# Altium PCB Power Electronics.PcbDoc
Units mm, origin at the board's own origin, x right, y up, seen from the top; angles counter-clockwise.
Board outline 88 x 88 mm, 4 copper layers (Top Layer, Int1 (GND), Int2 (PWR), Bottom Layer), stack 1.369 mm thick; 38 components, 27 nets, 116 pads, 292 vias.
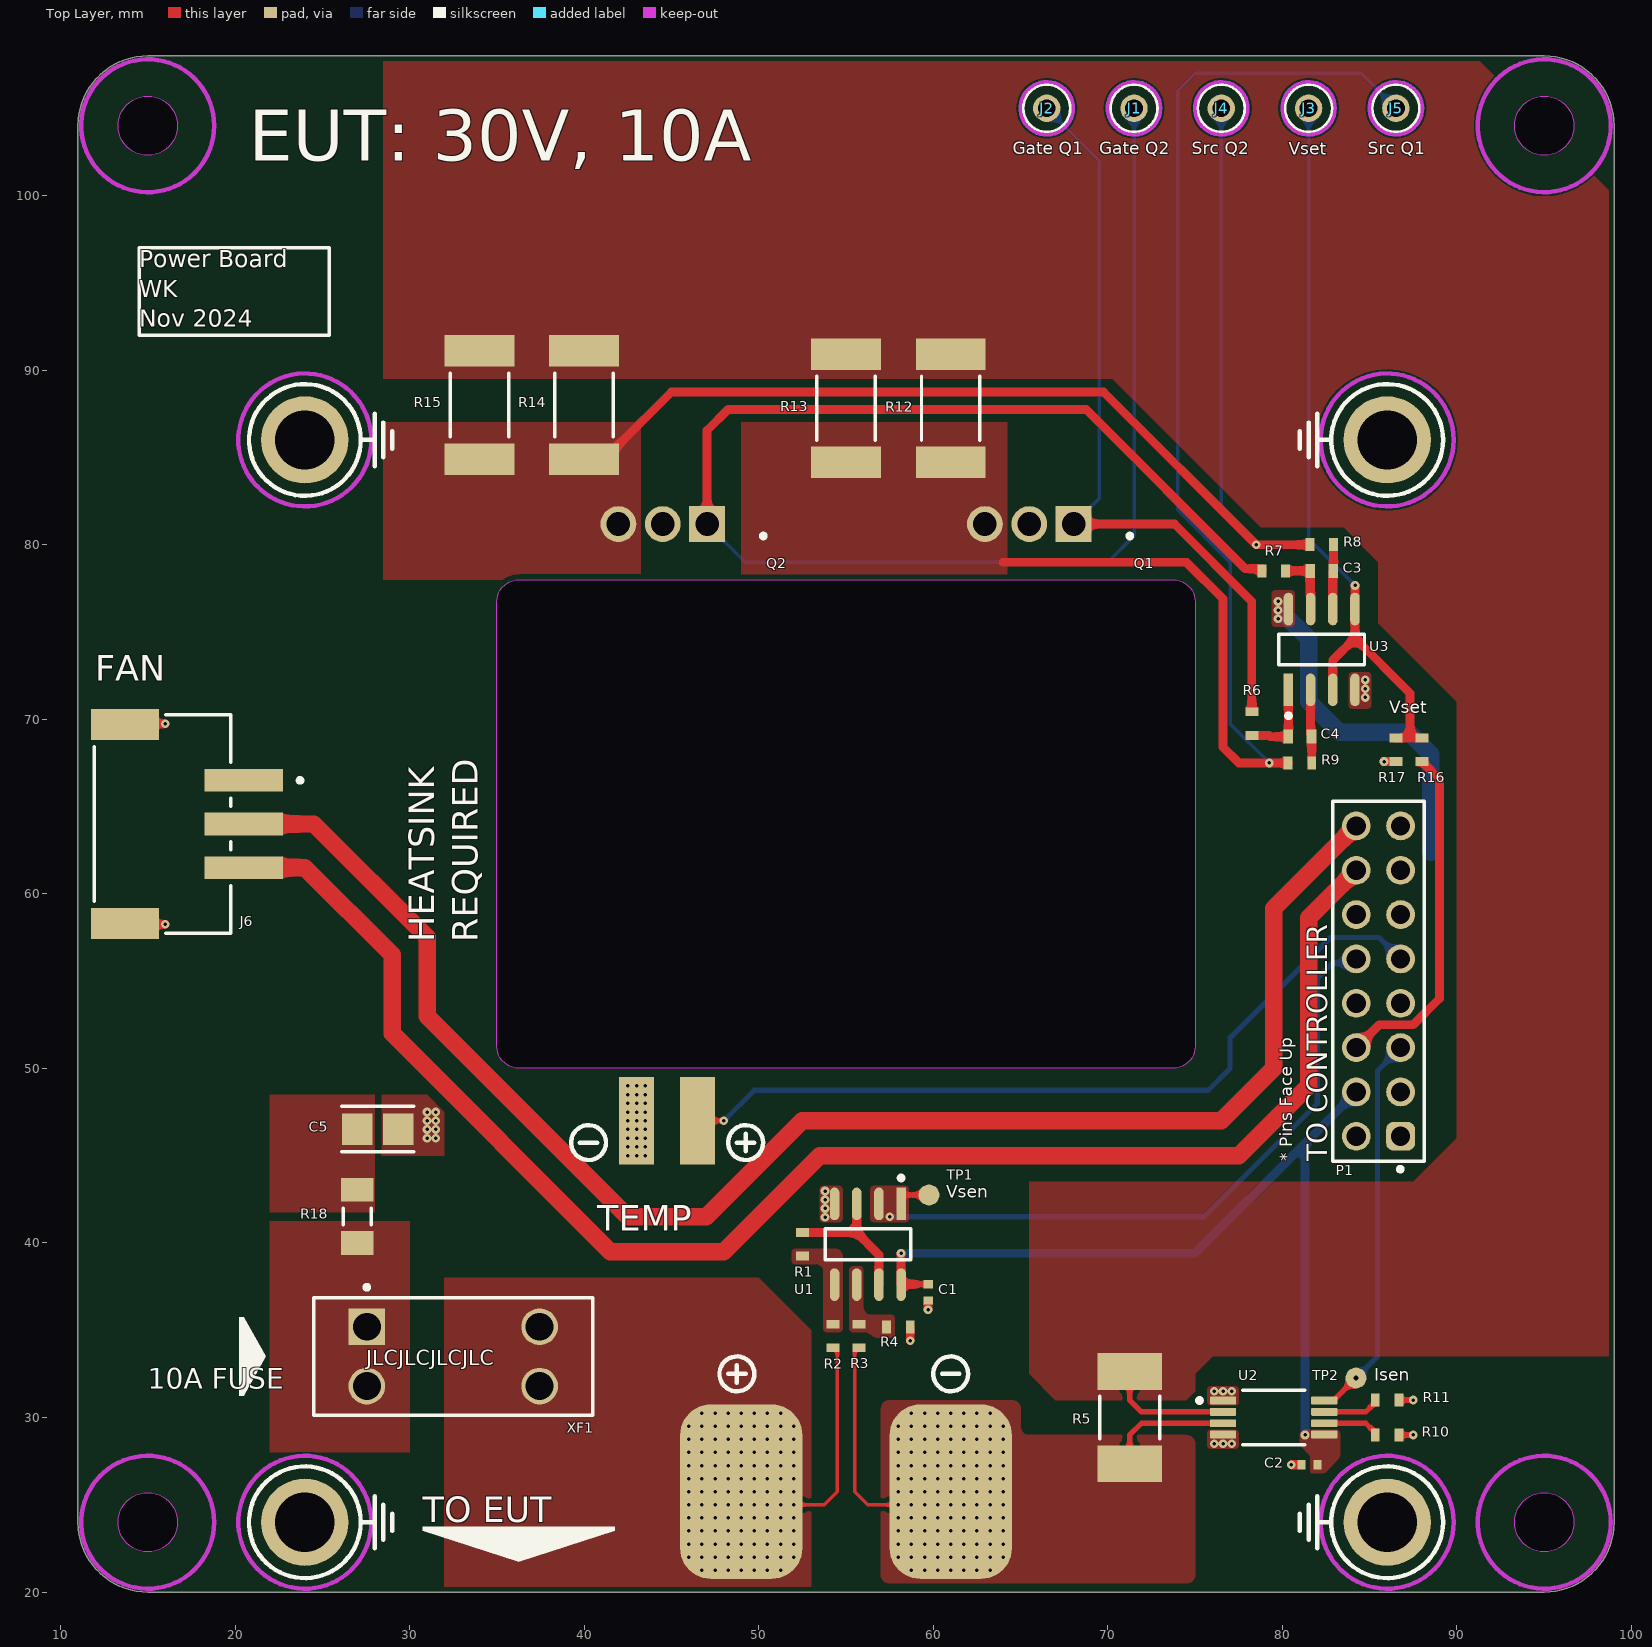
[diagram p0: Top Layer view]
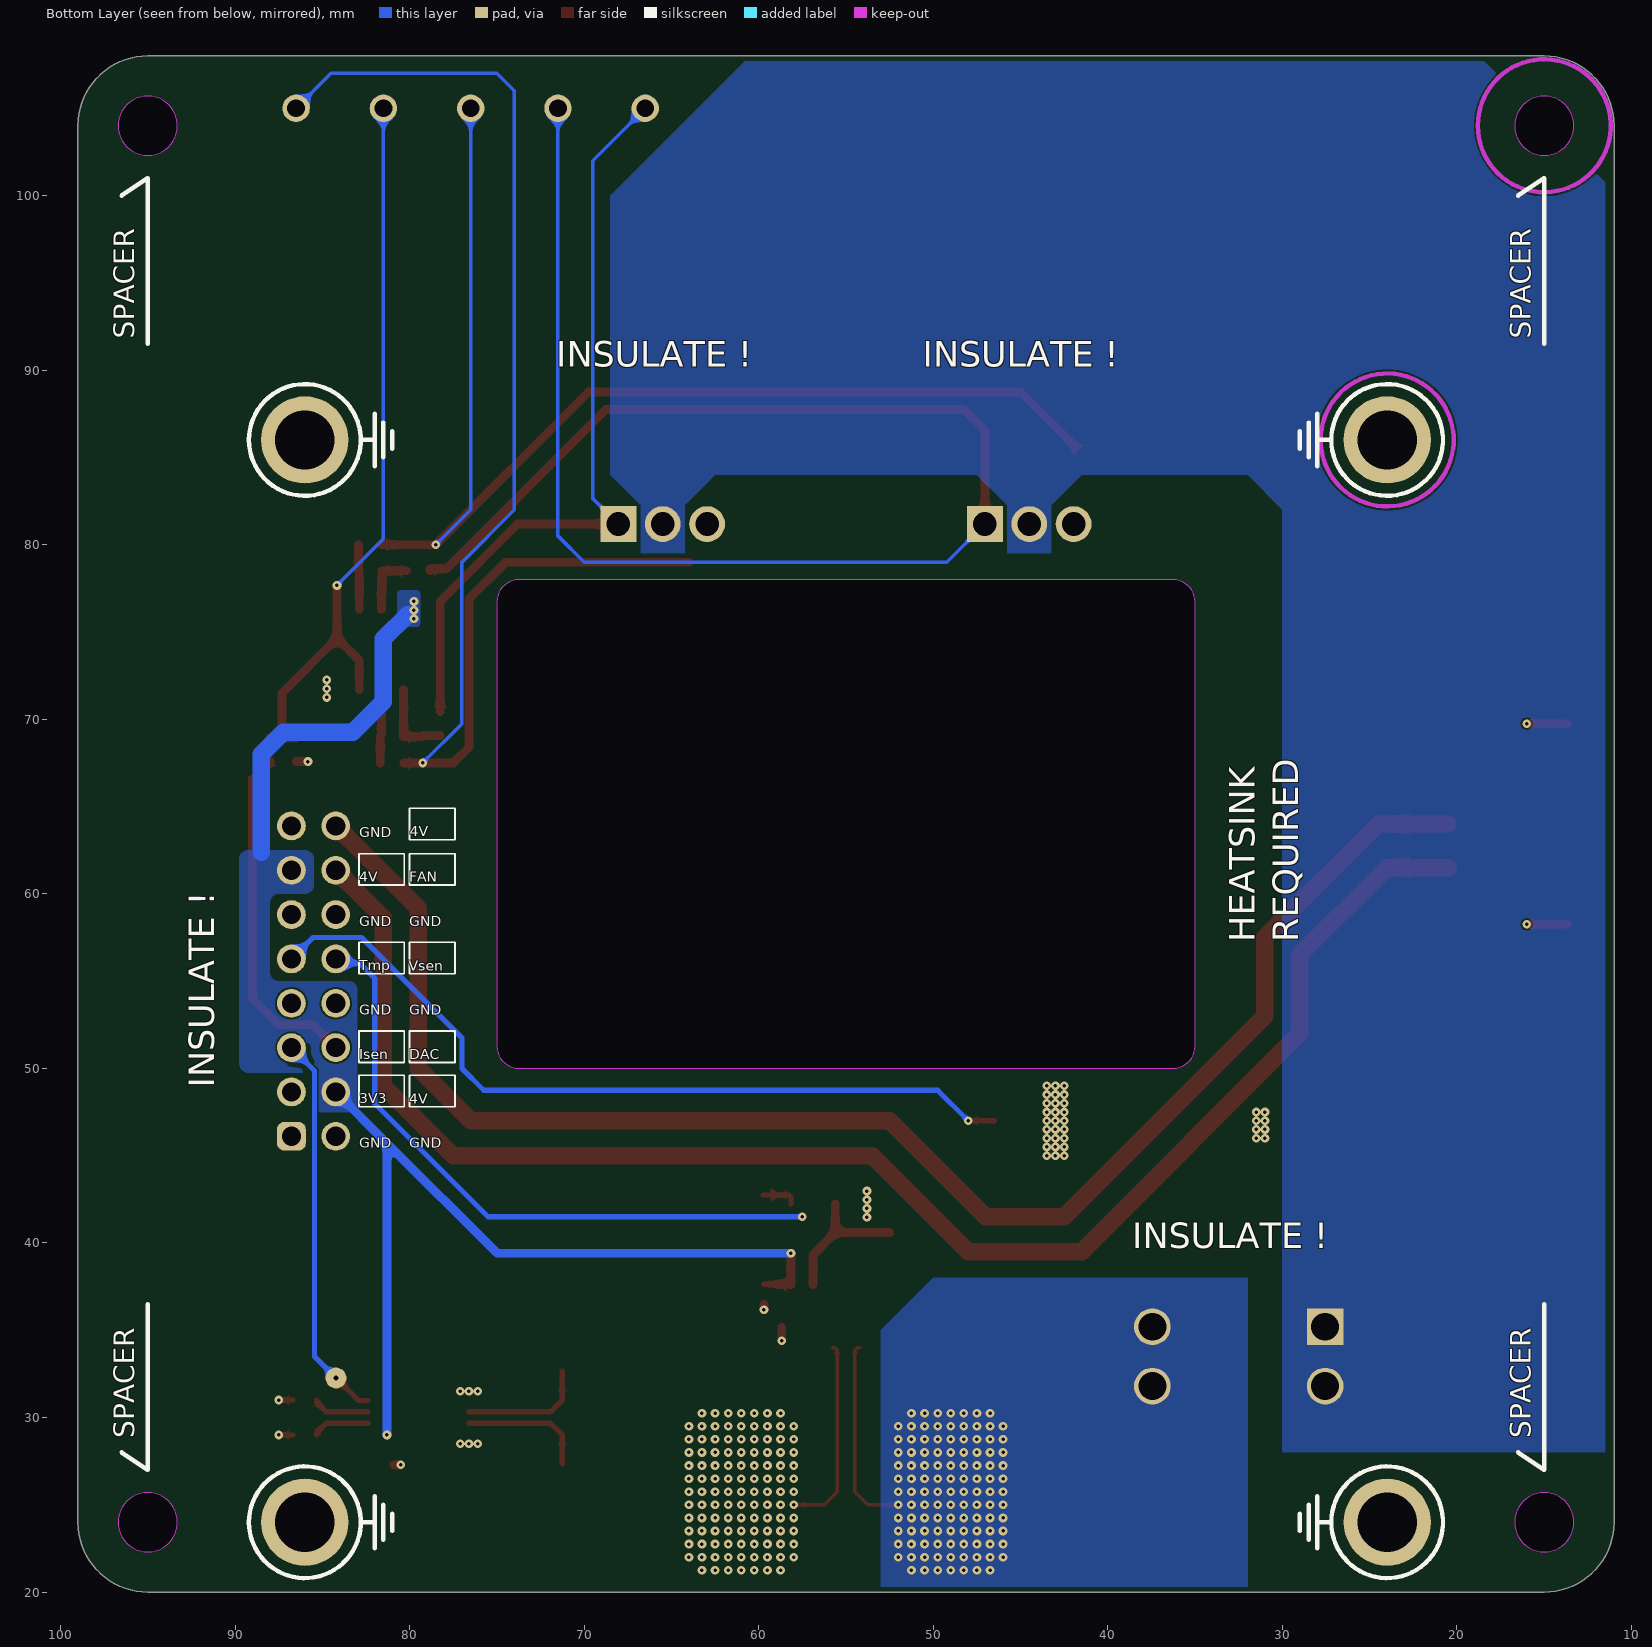
[diagram p1: Bottom Layer view, seen from below]
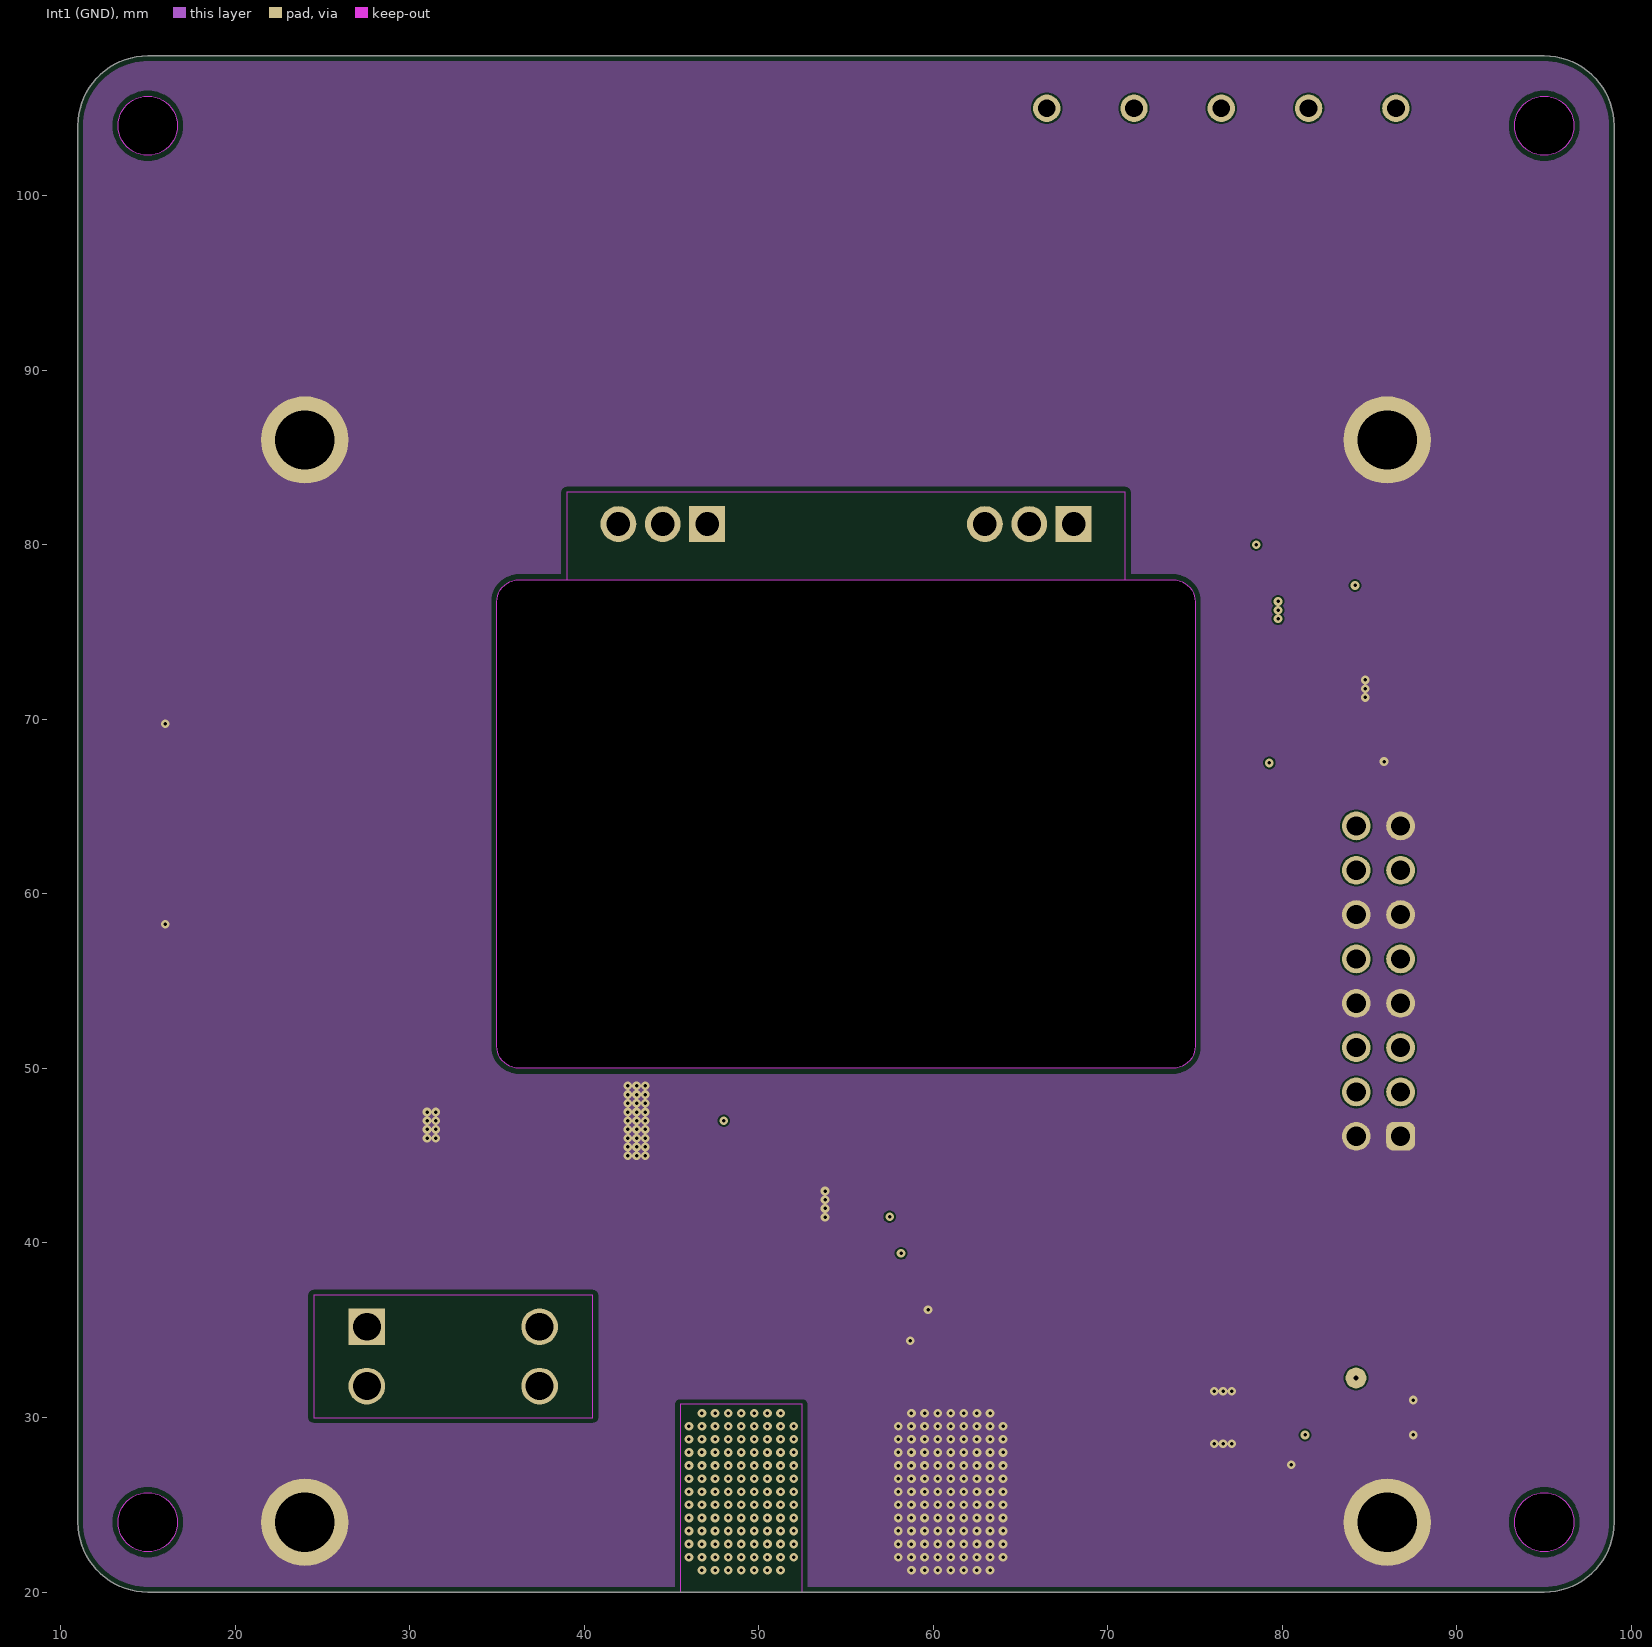
[diagram p2: Int1 (GND)]
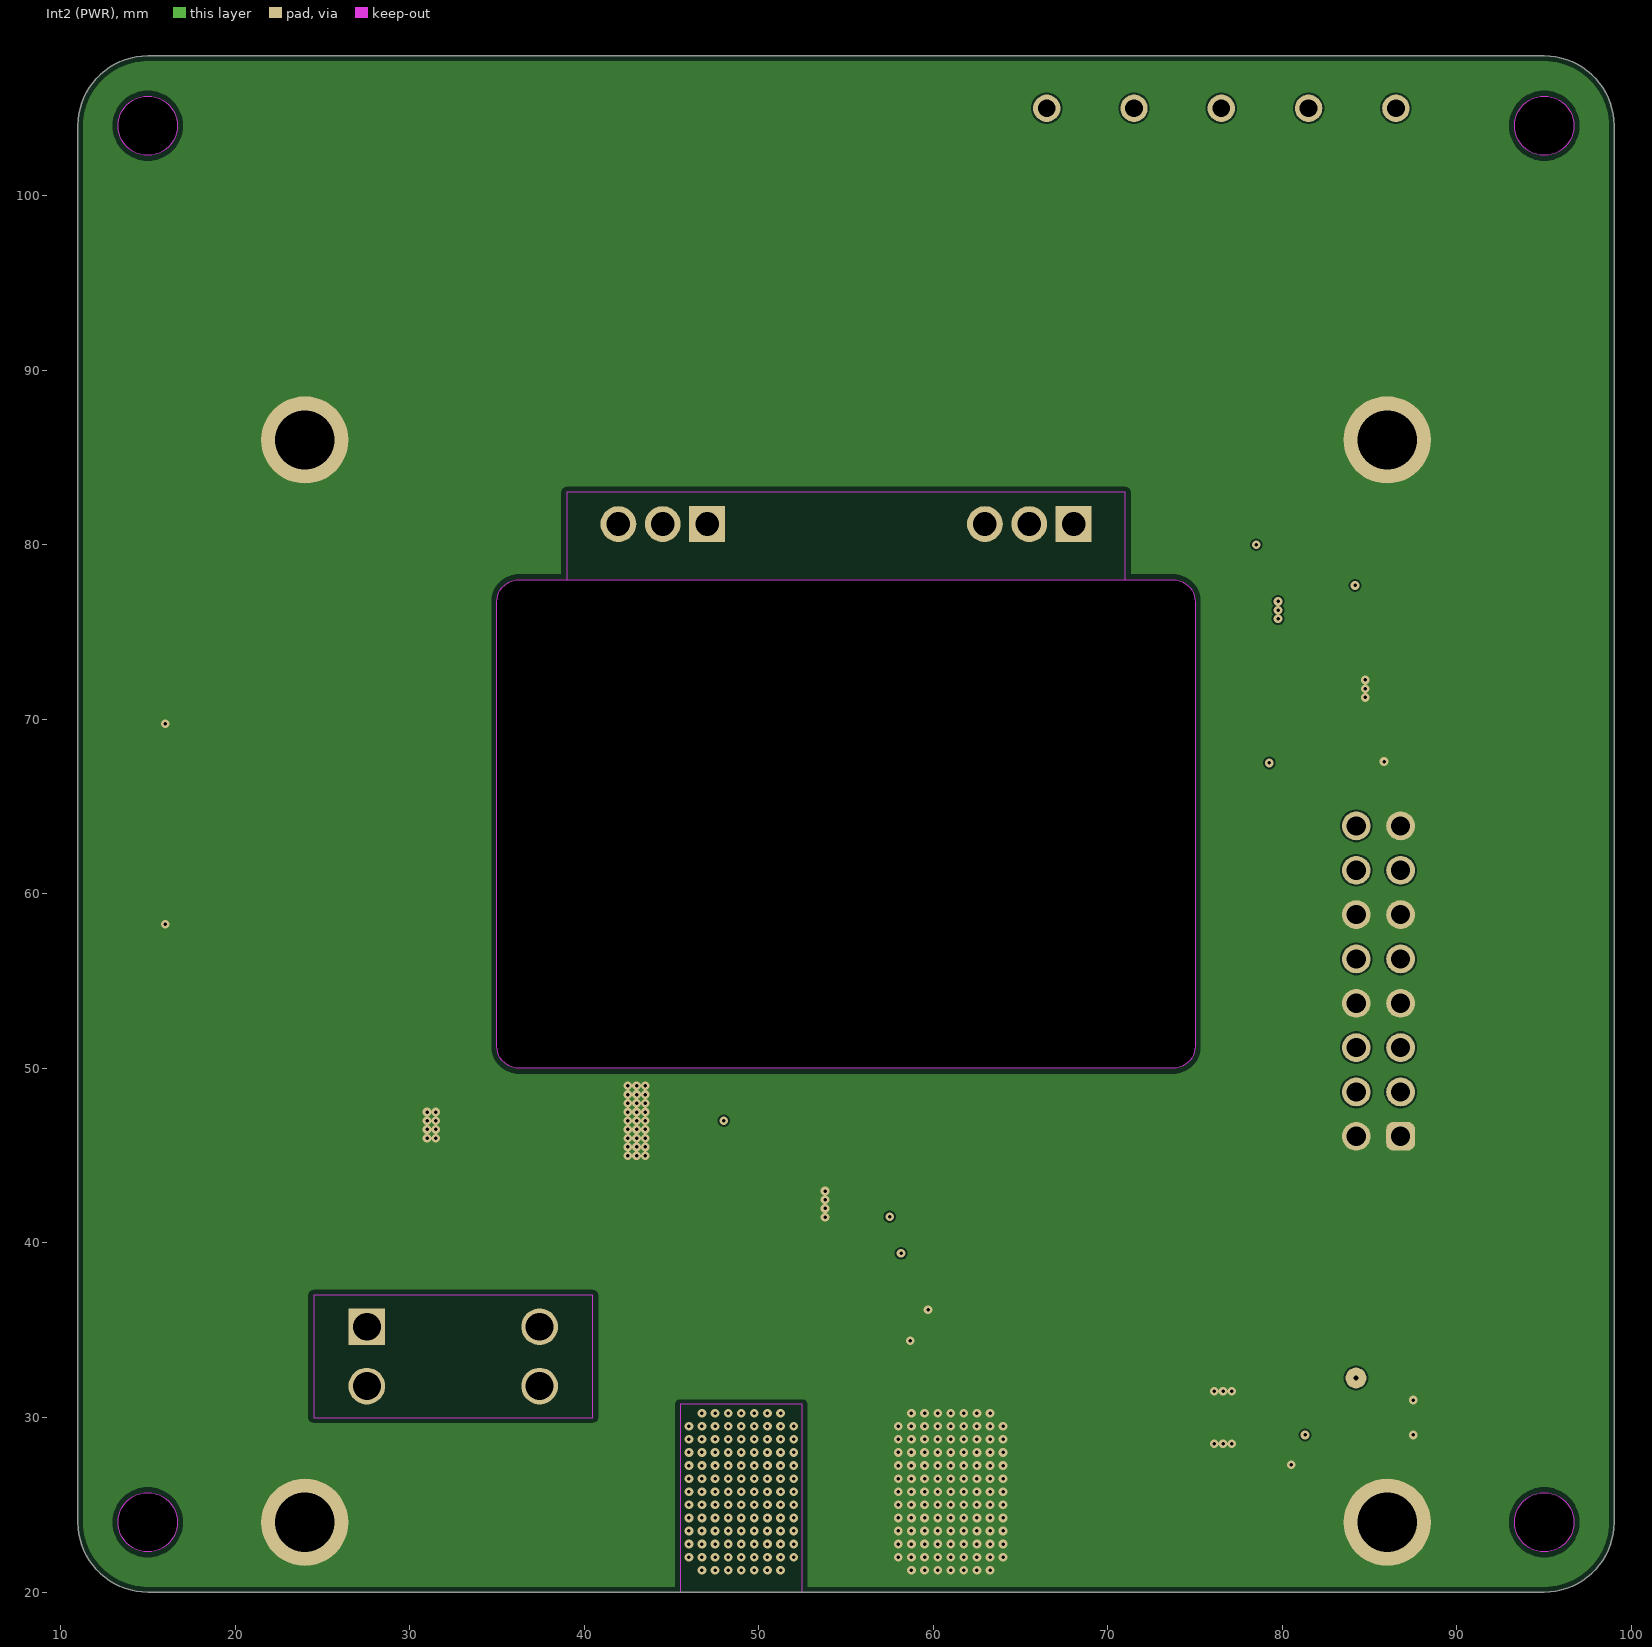
[diagram p3: Int2 (PWR)]

## Layer stack, top to bottom
Top Solder: solder mask 0.0254, SM-001, Dk 4
Top Layer: signal copper 0.035
Dielectric 1: prepreg 0.1295, PP-017, Dk 4.3
Dielectric 2: prepreg 0.1295, PP-017, Dk 4.3
Int1 (GND): signal copper 0.035
Dielectric 3: core 0.7112, Core-039, Dk 4.8
Int2 (PWR): signal copper 0.035
Dielectric 4: prepreg 0.1295, PP-017, Dk 4.3
Dielectric 5: prepreg 0.1295, PP-017, Dk 4.3
Bottom Layer: signal copper 0.035
Bottom Solder: solder mask 0.0254, SM-001, Dk 4

## Board outline
15,20 95,20 ccw(c95,24) 99,24 99,104 ccw(c95,104) 95,108 15,108 ccw(c15,104) 11,104 11,24 ccw(c15,24)
cut-out: 36.27,50 cw(c36.27,51.27) 35,51.27 35,76.73 cw(c36.27,76.73) 36.27,78 73.73,78 cw(c73.73,76.73) 75,76.73 75,51.27 cw(c73.73,51.27) 73.73,50
cut-out: 15,102.3 cw(c15,104) 13.3,104 cw(c15,104) 15,105.7 cw(c15,104) 16.7,104 cw(c15,104)
cut-out: 95,102.3 cw(c95,104) 93.3,104 cw(c95,104) 95,105.7 cw(c95,104) 96.7,104 cw(c95,104)
cut-out: 95,22.3 cw(c95,24) 93.3,24 cw(c95,24) 95,25.7 cw(c95,24) 96.7,24 cw(c95,24)
cut-out: 15,22.3 cw(c15,24) 13.3,24 cw(c15,24) 15,25.7 cw(c15,24) 16.7,24 cw(c15,24)

## Design rules (kind name [scope] priority, off if disabled: settings)
BoardOutlineClearance [All] p1: gap=0.3 ignorepadtopadclearanceinfootprint=FALSE
Clearance [All] p1: gap=0.1 ignorepadtopadclearanceinfootprint=FALSE except(0.3: Fill-Fill Fill-Poly Fill-Region Poly-Poly Poly-Region Region-Region)
DiffPairsRouting [All] p1: maxlimit=0.3 minlimit=0.1 mostfreqgap=0.2 toplayer_minwidth=0.1 toplayer_maxwidth=0.381 toplayer_prefwidth=0.3 midlayer1_minwidth=0.1 midlayer1_maxwidth=0.381 midlayer1_prefwidth=0.3 midlayer2_minwidth=0.1 midlayer2_maxwidth=0.381 midlayer2_prefwidth=0.3 bottomlayer_minwidth=0.1 bottomlayer_maxwidth=0.381 bottomlayer_prefwidth=0.3 maxuncoupledlength=12.7
HoleSize [All] p1: absolutevalues=TRUE maxlimit=5 minlimit=0.025 maxpercent=80.000 minpercent=20.000
MinimumSolderMaskSliver [All] p1: minsoldermaskwidth=0.025
PlaneClearance [All] p1: clearance=0.1
PlaneConnect [All] p1: planeconnectstyle=Direct reliefexpansion=0.508 reliefentries=4 reliefconductorwidth=0.254 reliefairgap=0.254
PolygonConnect [All] p1: connectstyle=Direct reliefconductorwidth=0.254 reliefentries=4 polygonreliefangle="90 Angle" airgapwidth=0.254
RoutingVias [All] p1: holewidth=0.711 width=1.27 viastyle="Through Hole" minholewidth=0.711 minwidth=1.27 maxholewidth=0.711 maxwidth=1.27
SilkToSilkClearance [All] p1: silktosilkclearance=0
SilkToSolderMaskClearance [IsPad] p1: minsilkscreentomaskgap=0.1 clearancetoexposedcopper=TRUE
SolderMaskExpansion [All] p1: expansion=0.102 istentingtop=FALSE
SupplyNets "Schematic Supply Nets_3" [InNet('+4.096V')] p1: voltage=0.000
SupplyNets "Schematic Supply Nets_2" [InNet('GND')] p2: voltage=0.000
SupplyNets "Schematic Supply Nets_1" [InNet('+12V')] p3: voltage=0.000
SupplyNets "Schematic Supply Nets" [InNet('+3V3')] p4: voltage=0.000
Width [All] p1: maxlimit=5 minlimit=0.1 preferedwidth=0.2
23 further rules are at their usual default settings.

## Classes and differential pairs
component class Top: J6
component class U_MOSFETs: C3 C4 C5 J1 J2 J3 J4 J5 Q1 Q2 R6 R7 R8 R9 R12 R13 R14 R15 R16 R17 R18 U3
component class "U_Power Monitor": C1 C2 R1 R2 R3 R4 R5 R10 R11 TP1 TP2 U1 U2
component class U_IO: P1 XF1

## Components (designator, comment, footprint, x,y, rotation, side; value= is the part's Value field where it differs from the comment)
C1 "100nF" "IPC C C0402 NO SILK" 59.7,37.175 r90 top
C2 "100nF" "IPC C C0402 NO SILK" 81.54,27.29 r0 top
C3 "220pF" "IPC C C0603 NO SILK" 82.25,78.5 r180 top
C4 "220pF" "IPC C C0603 NO SILK" 81,69 r180 top
C5 "C3216X7S2A225K160AB" FP-C3216-160-0_2-IPC_B 28.176,46.526 r0 top
J1 "5001" FP-5001-MFG 71.5,105 r90 top
J2 "5001" FP-5001-MFG 66.5,105 r90 top
J3 "5001" FP-5001-MFG 81.5,105 r90 top
J4 "5001" FP-5001-MFG 76.5,105 r90 top
J5 "5001" FP-5001-MFG 86.5,105 r90 top
J6 "S3B-XH-SM4-TB(LF)(SN)" FP-S3B-XH-SM4-TB_LF_SN-MFG 15.85,64 r270 top
P1 "61301621121" 61301621121 85.5,55 r90 top
Q1 "IRF530PBF" FP-X15-0364-MFG 65.5,80.5 r270 top
Q2 "IRF530PBF" FP-X15-0364-MFG 44.5,80.5 r270 top
R1 "2K" "IPC C R0603 NO SILK" 52.5,39.925 r90 top
R2 "20K" "IPC C R0603 NO SILK" 54.25,34.675 r90 top
R3 "20K" "IPC C R0603 NO SILK" 55.75,34.675 r90 top
R4 "2K" "IPC C R0603 NO SILK" 58,35.175 r0 top
R5 "WSLP25125L000FEA" FP-WSLP2512-0R005-0R0069-MFG 71.25,30 r90 top
R6 "100R" "IPC C R0603 NO SILK" 78.25,69.75 r90 top
R7 "100R" "IPC C R0603 NO SILK" 79.5,78.5 r180 top
R8 "3K3" "IPC C R0603 NO SILK" 82.25,80 r180 top
R9 "3K3" "IPC C R0603 NO SILK" 81,67.5 r180 top
R10 "0R" "IPC C R0603 NO SILK" 86,29 r180 top
R11 "0R" "IPC C R0603 NO SILK" 86,31 r180 top
R12 "200mΩ" FP-RL2512-MFG 61,87.815 r270 top
R13 "200mΩ" FP-RL2512-MFG 55,87.815 r270 top
R14 "200mΩ" FP-RL2512-MFG 40,88 r270 top
R15 "200mΩ" FP-RL2512-MFG 34,88 r270 top
R16 "68K" "IPC C R0603 NO SILK" 88,68.25 r270 top
R17 "12K" "IPC C R0603 NO SILK" 86.5,68.25 r90 top
R18 "CRCW12062R20FKEA" FP-CRCW1206-e3-IPC_A 27,41.526 r270 top
TP1 "TP1" TP1#1 59.75,42.75 r90 top
TP2 "TP1" TP1#2 84.213,32.263 r90 top
U1 "LMV358AIDR" FP-D0008A-IPC_C 56.25,39.925 r270 top
U2 "INA240A2PWR" FP-PW0008A-MFG 79.5,30 r0 top
U3 "LMV358AIDR" FP-D0008A-IPC_C 82.25,74 r90 top
XF1 "3568" KSTN-3568_V 32.5,33.5 r0 top

## Footprints (in the part's own frame and the unit in brackets; to place one, negate y for a bottom-side part, rotate by r counter-clockwise, add the part's x,y. Pads: shape width x height; smd on the part's side, far side on the other; paste and mask are expansions set on the pad)
61301621121 [mm] "Pin Header, pitch 2.54 mm, THT, Vertical, dual row, 16p"
  rrect50% 1.65x1.65 hole 1.1: 1(-8.89,-1.27)
  round 1.65 hole 1.1: 2(-8.89,1.27) 3(-6.35,-1.27) 4(-6.35,1.27) 5(-3.81,-1.27) 6(-3.81,1.27) 7(-1.27,-1.27) 8(-1.27,1.27) 9(1.27,-1.27) 10(1.27,1.27) 11(3.81,-1.27) 12(3.81,1.27) 13(6.35,-1.27) 14(6.35,1.27) 15(8.89,-1.27) 16(8.89,1.27)
  silkscreen extent -10.89,-2.62 10.31,2.62, body extent -10.16,-2.54 10.16,2.54, height 8.59
FP-5001-MFG [mm]
  round 1.57 hole 1.016 paste-2539.97 mask+0: 1(0,0)
  silkscreen extent -1.34,-1.35 1.34,1.35, body extent -1.45,-1.45 1.45,1.45, height 0.25
FP-C3216-160-0_2-IPC_B [mm]
  rect 1.754x1.806 smd paste+0 mask+0: 1(-1.176,0) 2(1.176,0)
  silkscreen extent -2.05,-1.3 2.05,1.3, body extent -2.3,-1.15 2.3,1.15, height 0.25
FP-CRCW1206-e3-IPC_A [mm]
  rect 1.356x1.858 smd paste+0 mask+0: 1(-1.526,0) 2(1.526,0)
  silkscreen extent -0.47,-0.8 0.47,0.8, body extent -2.7,-1.43 2.7,1.43, height 0.25
FP-D0008A-IPC_C [mm]
  rect 1.869x0.542 smd paste+0 mask+0: 1(-2.314,1.905)
  rrect100% 1.869x0.542 smd paste+0 mask+0: 2(-2.314,0.635) 3(-2.314,-0.635) 4(-2.314,-1.905) 5(2.314,-1.905) 6(2.314,-0.635) 7(2.314,0.635) 8(2.314,1.905)
  silkscreen extent -3.92,-2.45 0.88,2.45, body extent -3.35,-2.55 3.35,2.55, height 0.25
FP-PW0008A-MFG [mm]
  rrect22% 1.5x0.45 smd paste+0 mask+0: 1(-2.9,0.975) 2(-2.9,0.325) 3(-2.9,-0.325) 4(-2.9,-0.975) 5(2.9,-0.975) 6(2.9,-0.325) 7(2.9,0.325) 8(2.9,0.975)
  silkscreen extent -4.37,-1.55 1.78,1.55, body extent -3.75,-1.8 3.75,1.8, height 0.25
FP-RL2512-MFG [mm]
  rect 1.8x4 smd paste+0 mask+0: 1(-3.1,0) 2(3.1,0)
  silkscreen extent -1.83,-1.68 1.83,1.68, body extent -4.1,-2.1 4.1,2.1, height 0.25
FP-S3B-XH-SM4-TB_LF_SN-MFG [mm]
  rect 1.3x4.5 smd paste+0 mask+0: 1(-2.5,4.65) 2(0,4.65) 3(2.5,4.65)
  rect 1.8x3.9 smd paste+0 mask+0: 4(-5.7,-2.15) 5(5.7,-2.15)
  silkscreen extent -6.25,-3.9 6.25,8, body extent -6.7,-4.2 6.7,7, height 0.25
FP-WSLP2512-0R005-0R0069-MFG [mm]
  rect 2.11x3.68 smd paste+0 mask+0: 1(-2.645,0) 2(2.645,0)
  silkscreen extent -1.21,-1.72 1.21,1.72, body extent -3.8,-1.94 3.8,1.94, height 0.25
FP-X15-0364-MFG [mm]
  rect 2.05x2.05 hole 1.35 paste-2539.97 mask+0: 1(-0.685,2.54)
  round 2.05 hole 1.35 paste-2539.97 mask+0: 2(-0.685,0) 3(-0.685,-2.54)
  silkscreen extent -0.12,5.64 0.12,5.89, body extent -2.42,-5.36 2.42,5.36, height 0.25
"IPC C C0402 NO SILK" [mm] "Chip Capacitor, 2-Leads, Body 1.02x0.51mm, IPC High Density"
  rect 0.46x0.54 smd: 1(-0.46,0) 2(0.46,0)
  body extent -0.51,-0.26 0.51,0.25, height 0.51
"IPC C C0603 NO SILK" [mm] "Chip Capacitor, 2-Leads, Body 1.52x0.76mm, IPC High Density"
  rect 0.56x0.8 smd: 1(-0.66,0) 2(0.66,0)
  body extent -0.76,-0.38 0.76,0.38, height 0.77
"IPC C R0603 NO SILK" [mm] "Chip Resistor, 2-Leads, Body 1.52x0.76mm, IPC High Density"
  rect 0.5x0.75 smd: 1(-0.675,0) 2(0.675,0)
  body extent -0.76,-0.38 0.76,0.38, height 0.39
KSTN-3568_V [mm] "THD, 4-Leads, Body 16x6.73mm, Pitch 9.9mm"
  rect 2.1x2.1 hole 1.6: 1(-4.95,1.7)
  round 2.1 hole 1.6: 2(-4.95,-1.7) 3(4.95,1.7) 4(4.95,-1.7)
  silkscreen extent -8,-3.36 8,4.09, body extent -8,-3.37 8,3.37, height 7.44
TP1#1 [mm]
  round 1.2 smd: 1(0,0)
TP1#2 [mm]
  round 1.2 hole 0.3: 1(0,0)

## Part data
C1 C2: library part CMP-002-000000-1, Design Item ID="Generic CAP 0402", Source=Schlib1.SchLib
C3 C4: library part CMP-002-000001-1, "Generic CAP 0603", Design Item ID="Generic CAP 0603", Source=Schlib1.SchLib
C5: library part CMP-08246-004303-1, "Multilayer Ceramic Capacitors 2.2uF ±10% 100V X7S SMD 1206", Capacitance=2.2uF, Case Code (Imperial)=1206, Case Code (Metric)=3216, Dielectric=X7S, Max Operating Temperature=125°C, Min Operating Temperature=-55°C, Package Quantity=1, Resistor Type=Ceramic, Tolerance=10%, Voltage=100V, Case/Package=1206, Construction=Flat, Depth=1.6mm, Height=1.6mm, Lead Free="Lead Free", Length=3.2mm, Mount="Surface Mount", Number of Pins=2, Packaging="Tape and Reel", Radiation Hardening=No, REACH SVHC="No SVHC", RoHS Compliant=Yes, Series=C, Termination=SMD/SMT, Thickness=0.071inch, Voltage Rating=100V, Voltage Rating (DC)=100V, Weight=0.000571oz, Width=0.063inch
J1 J2 J3 J4 J5: library part CMP-2000-05181-2, "PC TEST POINT MINIATURE BLACK", Color=Black, Flammability Rating="UL94 V-0", Package Quantity=100, Body Material=Bronze, Contact Material=Bronze, Contact Plating=Silver, Diameter=2.54mm, Height=0.3inch, Hole Diameter=1.6mm, Housing Color=Black, Inside Diameter=1.27mm, Insulation=Insulated, Insulation Material=Nylon, Lead Free="Lead Free", Length=7.62mm, Material=Nylon, Mount="Through Hole", Number of Contacts=1, Number of Ports=1, Orientation=Straight, Outside Diameter=2.54mm, Packaging=Bulk, Plating=Silver, REACH SVHC="No SVHC", RoHS Compliant=Yes, Series=THM, Termination="Through Hole"
J6: library part CMP-17439-000066-1, "CONN HEADER SMD R/A 3POS 2.5MM", Color=Natural, Contact Resistance=20mR, Housing Color=Beige, Max Current Rating=3A, Max Operating Temperature=85°C, Max Voltage Rating (AC)=250V, Min Operating Temperature=-25°C, Package Quantity=1, Connector Type="Male Pin", Contact Material="Copper Alloy", Contact Plating=Tin, Contact Type="Male Pin", Depth=10mm, Fastening Type=Detent, Gender=Male, Housing Material=Polyamide, Lead Free="Lead Free", Length=12.5mm, Mount="Surface Mount", Number of Contacts=3, Number of Positions=3, Number of Rows=1, Orientation="Right Angle", Packaging="Tape and Reel", Pitch=2.5mm, REACH SVHC="No SVHC", Series=XH, Termination=Solder
P1: library part CMP-1502-01097-3, Color=Black, Contact Resistance=20mΩ, Current Rating=3A, Max Operating Temperature=105°C, Min Operating Temperature=-40°C, Operating Supply Voltage=250V, Connector Type="Male Pin", Contact Material=Copper, Contact Mating Length=5.9944mm, Contact Plating=Gold, Gender=Male, Height=8.89mm, Lead Pitch=2.54mm, Mount="Through Hole", NexarPartId=32855550, Number of Contacts=16, Number of Pins=16, Number of Positions=16, Number of Rows=2, Orientation=Vertical, Packaging=Bulk, Pitch=2.54mm, REACH SVHC=Unknown, RoHS=Compliant, Row Spacing=2.54mm, Termination=Solder, Voltage Rating=250V
Q1 Q2: library part CMP-02550-000190-1, "MOSFET N-CH 100V 14A TO-220AB", Continuous Drain Current=14A, Drain To Source Breakdown Voltage=100V, Drain To Source Resistance=0.16Ω, Gate To Source Voltage=20V, Input Capacitace At Vds="670pF @ 25V", Manufacturer=Vishay, Max Forward Diode Voltage=2.5V, Max Junction Temp=+175°C, Package=X15-0364, Power Dissipation=88W, Pulse Drain Current=56A, Temperature="-55°C to +175°C", Temperature Range Low=-55°C, Automotive=No, Category=Trans, ComponentLink2Description=Datasheet, ComponentLink2URL=http://www.vishay.com/docs/91019/91019.pdf, Depletion Mode=False, Device Class L1="Discrete Semiconductors", Device Class L2=Transistors, Device Class L3=MOSFETs, Digikey Description="MOSFET N-CH 100V 14A TO-220AB", Drain To Source Voltage=100V, Gate Charge At Vgs="26nC @ 10V", Height=19.89mm, Lead Free=Yes, Manufacturer Part Number=IRF530PBF, Mouser Description="MOSFET N-Chan 100V 14 Amp", Number of Channels=1, Number Of N Channels=1, Octopart=https://octopart.com/irf530pbf-vishay-46547999, Reverse Recovery Charge=850nC, Reverse Recovery Time=150ns, RoHS=TRUE, Rthja Max=62°C/W, Standoff Height=3.33mm, Temperature Range High=+175°C, Threshold Vgs Max=4V, Threshold Vgs Min=2V, Turn Off Delay Time=23ns, Turn On Delay Time=10ns
R1 R4 R6 R7 R8 R9 R10 R11 R16 R17: library part CMP-008-000001-2, "Generic RES 0603", Design Item ID="Generic RES 0603", Source=Schlib1.SchLib
R2 R3: library part CMP-008-000001-2, "Generic RES 0603 / C136942", Design Item ID="Generic RES 0603", Source=Schlib1.SchLib
R5: library part CMP-00030-22061781-1, "WSLP25125L000FEA Res Metal Strip 2512 0.005 Ohm 1% 3W ±110ppm/C Sulfur Resistant Pad SMD Automotive T/R", Case Code (Imperial)=2512, Case Code (Metric)=6432, Max Operating Temperature=170°C, Min Operating Temperature=-65°C, Power Rating=3W, Resistance=5mΩ, Temperature Coefficient=110ppm/°C, Tolerance=1%, Case/Package=2512, Composition="Metal Element, Metal Strip", Height=635µm, Lead Free="Lead Free", Length=6.4mm, Mount="Surface Mount", NexarPartId=22061781, Packaging="Cut Tape", REACH SVHC=Unknown, RoHS=Compliant, Schedule B="8533210045, 8533210045", Termination=SMD/SMT, Width=3.2mm
R12 R13 R14 R15: library part CMP-03412-002864-1, "RES 0.2 OHM 1% 1W 2512 / RL2512FK-070R2L", Manufacturer=Yageo, Manufacturer Part Number=RL2512FK-070R2L, Package=RL2512, Power Rating=1W, Temperature="-55°C to +155°C", Temperature Coefficient=600ppm/°C, Temperature Range High=+155°C, Temperature Range Low=-55°C, Tolerance=1%, Automotive=Yes, Automotive Grade="Grade 0", Category=Res, ComponentLink2Description=Datasheet, ComponentLink2URL=http://www.yageo.com/documents/recent/PYu-RL_Group_521_RoHS_L_2.pdf, Composition="Thick Film", Device Class L1="Passive Components", Device Class L2=Resistors, Device Class L3="Chip SMD Resistors", Digikey Description="RES 0.2 OHM 1% 1W 2512", Footprint Url=http://www.yageo.com/exep/pages/download/literatures/PYu-R_Mount_10.pdf, Height=0.65mm, Ipc Land Pattern Name=RESC635320X55, Lead Free=Yes, Mouser Description="Res Thick Film 2512 0.2 Ohm 1% 1W ±600ppm/C Epoxy Pad SMD Automotive T/R", Octopart=https://octopart.com/rl2512fk-070r2l-yageo-22252310, Resistance=200mΩ, RoHS=TRUE, Series=RL
R18: library part CMP-2003-02449-2, "RES Thick Film, 2.2Ω, 1%, 0.25W, 100ppm/°C, 1206", Case Code (Imperial)=1206, Case Code (Metric)=3216, Max Operating Temperature=155°C, Max Power Dissipation=250mW, Min Operating Temperature=-55°C, Package Quantity=10, Resistance=2.2R, Temperature Coefficient=100ppm/°C, Tolerance=1%, Voltage Rating=200V, Case/Package=1206, Composition="Thick Film", Contact Plating=Tin, Depth=1.6mm, Features="Automotive AEC-Q200", Height=0.55mm, Lead Free="Lead Free", Length=3.2mm, Military Standard=Not, Number of Pins=2, Number of Terminations=2, Packaging="Tape and Reel", Power Rating=250mW, Radiation Hardening=No, Termination=SMD/SMT, Voltage Rating (DC)=200V, Weight=0.000353oz, Width=0.063inch
TP1 TP2: library part CMP-00003-3, "Testpoint double sided"
U1: library part CMP-04895-000233-1, "IC OPAMP GP 2 CIRCUIT 8SOIC / C182039", Case/Package=SOIC, Input Bias Current=10pA, Input Offset Voltage (Vos)=1mV, Max Operating Temperature=125°C, Min Operating Temperature=-40°C, Operating Supply Current=80uA, Gain Bandwidth Product=1MHz, Mount="Surface Mount", Number of Channels=2, Number of Circuits=2, Number of Pins=8, Packaging="Cut Tape", RoHS Compliant=Yes, Slew Rate=1.7V/µs
U2: library part CMP-04895-000047-1, "IC AMP CURRENT SENSE 8-TSSOP", Ambient Temperature Range High=+125°C, Ambient Temperature Range Low=-40°C, Input Bias Current=90uA, Input Offset Voltage=0.005mV, Manufacturer="Texas Instruments", Max Junction Temp=+150°C, Max Supply Voltage=5.5V, Min Supply Voltage=2.7V, Nominal Supply Current=1.8mA, Package=PW0008A, Temperature="-40°C to +125°C", Voltage Gain=0.05V/mV, Automotive=No, Bandwidth=400kHz, Category=IC, ComponentLink2Description=Datasheet, ComponentLink2URL=http://www.ti.com/lit/ds/symlink/ina240.pdf, Device Class L1="Integrated Circuits (ICs)", Device Class L2="Linear ICs", Device Class L3=Instrumentation, Digikey Description="IC AMP CURRENT SENSE 8-TSSOP", Height=1.2mm, Ipc Land Pattern Name=SOP65P300X120-8, Lead Free=Yes, Manufacturer Part Number=INA240A2PWR, Number of Channels=1, Octopart=https://octopart.com/ina240a2pwr-texas+instruments-75431049, RoHS=TRUE, Standoff Height=0.05mm, Temperature Range High=+125°C, Temperature Range Low=-40°C
U3: library part CMP-04895-000233-1, "IC OPAMP GP 2 CIRCUIT 8SOIC", Case/Package=SOIC, Input Bias Current=10pA, Input Offset Voltage (Vos)=1mV, Max Operating Temperature=125°C, Min Operating Temperature=-40°C, Operating Supply Current=80uA, Gain Bandwidth Product=1MHz, Mount="Surface Mount", Number of Channels=2, Number of Circuits=2, Number of Pins=8, Packaging="Cut Tape", RoHS Compliant=Yes, Slew Rate=1.7V/µs
XF1: library part CMP-2000-05464-1, "JLCPCB:  / C19727305 / Fuse Holder, 20 A, 500 V, -50 to 145 degC, 4-Pin THD, RoHS", Manufacturer=Keystone, Package Description="4-Pin Through Hole Device, Body 16 x 6.73 mm, Pitch 9.9 mm", Datasheet URL=https://datasheet.ciiva.com/16294/m60-2p40-16294706.pdf, Datasheet Version=04/2013, Manufacturer URL=http://www.keyelco.com/, Mounting Technology=ThroughHole, Package Reference=3568

## Free pads (board coordinates)
  round 5 hole 3.4: 11(24,24) 11(24,86) 11(86,24) 11(86,86)
  rrect50% 7x10 smd: 12(49,25.75) 12(61,25.75)
  rect 2x5 smd: 15(43,47) 15(46.5,47)

## Via types
v1: diameter 0.5, hole 0.2, Top Layer to Bottom Layer, tented both sides, 292 vias

## Nets (pads, with @x,y where several pads share a name; then routed paths per layer and width w, separated by ;. In a path a pad name is that pad's centre, name@x,y a point inside that pad or via, vN(x,y) a via of type N, cw(c..) or ccw(c..) an arc to the next point about the centre after c; other vN are vias at no path point)
10K_NTC: P1.9 pad.15@46.5,47 | length 46.2
  Top Layer w0.3: pad.15@46.5,47 v1(48,47)
  Bottom Layer w0.3: v1(48,47) 49.75,48.75 75.75,48.75 77,50 77,51.75 82.75,57.5 85.54,57.5 P1.9
+3V3: P1.3
+4.096V: C1.2 C2.2 P1.4 P1.13 U1.8 U2.5 U3.8 | length 69.4
  Top Layer w0.3: 59.04,37.635 C1.2
  Top Layer w0.5: U1.8 v1(58.155,39.405) ; U1.8@58.163,37.635 59.04,37.635
  Bottom Layer w0.5: v1(58.155,39.405) 74.985,39.405 81.3,45.72 ; v1(81.3,29) 81.3,45.72 ; P1.4 81.3,45.72
  Bottom Layer w1: 80.1,76 81.5,74.6 81.5,71 83.25,69.25 87.25,69.25 88.5,68 88.5,62.393
  other v1: 79.75,75.75 79.75,76.25 79.75,76.75
+12V: J6.2 P1.16 | length 90.3
  Top Layer w1: J6.2 24.5,64 31,57.5 31,53 42.5,41.5 47,41.5 52.5,47 76.5,47 79.5,50 79.5,59.16 P1.16
Control_Voltage: J3.1 R16.1 R17.2 U3.3 U3.5 | length 43.5
  Top Layer w0.5: U3.3 82.885,73.385 84.155,74.655 ; v1(84.163,77.663) 84.163,76.322 U3.5 84.155,74.655 ; R17.2 87.312,68.925 ; R16.1 87.312,68.925 ; 84.155,74.655 87.312,71.498 87.312,68.925
  Bottom Layer w0.2: J3.1 81.5,80.326 v1(84.163,77.663)
"DUT Input": pad.12@49,25.75 R2.1 XF1.3 XF1.4 | length 11.2
  Top Layer w0.2: v1(52,25) 53.75,25 54.5,25.75 54.5,33.85 54.35,34 R2.1
  other v1: 46.75,21.25 47.5,21.25 48.25,21.25 49,21.25 49.75,21.25 50.5,21.25 51.25,21.25 46,22 46.75,22 47.5,22 48.25,22 49,22 49.75,22 50.5,22 51.25,22 52,22 46,22.75 46.75,22.75 47.5,22.75 48.25,22.75 49,22.75 49.75,22.75 50.5,22.75 51.25,22.75 52,22.75 46,23.5 46.75,23.5 47.5,23.5 48.25,23.5 49,23.5 49.75,23.5 50.5,23.5 51.25,23.5 52,23.5 46,24.25 46.75,24.25 47.5,24.25 48.25,24.25 49,24.25 49.75,24.25 50.5,24.25 51.25,24.25 52,24.25 46,25 46.75,25 47.5,25 48.25,25 49,25 49.75,25 50.5,25 51.25,25 46,25.75 46.75,25.75 47.5,25.75 48.25,25.75 49,25.75 49.75,25.75 50.5,25.75 51.25,25.75 52,25.75 46,26.5 46.75,26.5 47.5,26.5 48.25,26.5 49,26.5 49.75,26.5 50.5,26.5 51.25,26.5 52,26.5 46,27.25 46.75,27.25 47.5,27.25 48.25,27.25 49,27.25 49.75,27.25 50.5,27.25 51.25,27.25 52,27.25 46,28 46.75,28 47.5,28 48.25,28 49,28 49.75,28 50.5,28 51.25,28 52,28 46,28.75 46.75,28.75 47.5,28.75 48.25,28.75 49,28.75 49.75,28.75 50.5,28.75 51.25,28.75 52,28.75 46,29.5 46.75,29.5 47.5,29.5 48.25,29.5 49,29.5 49.75,29.5 50.5,29.5 51.25,29.5 52,29.5 46.75,30.25 47.5,30.25 48.25,30.25 49,30.25 49.75,30.25 50.5,30.25 51.25,30.25
DUT_ISEN_P: R5.2 R12.1 R13.1 R14.1 R15.1 U2.2 | length 7.3
  Top Layer w0.3: R5.2 71.25,31 71.925,30.325 U2.2
FAN: J6.3 P1.14 | length 90.2
  Top Layer w1: J6.3 24,61.5 29,56.5 29,52 41.5,39.5 48,39.5 53.5,45 77.5,45 81.5,49 81.5,58.62 P1.14
Gate1: J2.1 Q1.1 R6.2 | length 44
  Top Layer w0.5: Q1.1 73.815,81.185 78.25,76.75 R6.2
  Bottom Layer w0.2: J2.1 69.5,102 69.5,82.645 Q1.1
Gate2: J1.1 Q2.1 R7.2 | length 92
  Top Layer w0.5: Q2.1 47.04,86.54 48.25,87.75 68.75,87.75 77.875,78.625 78.825,78.625 R7.2
  Bottom Layer w0.2: Q2.1 49.225,79 70,79 71.5,80.5 J1.1
GND: C1.1 C2.1 C5.2 J6.4 J6.5 P1.1 P1.2 P1.7 P1.8 P1.11 P1.12 P1.15 pad.11 pad.12@61,25.75 pad.15@43,47 R3.1 R4.2 R5.1 R10.1 R11.1 R17.1 U1.4 U2.1 U2.3 U2.4 U3.4 | length 26.9
  Top Layer w0.2: R3.1 55.65,34 55.5,33.85 55.5,25.75 56.25,25 v1(58,25)
  Top Layer w0.3: R5.1 71.25,29 71.925,29.675 U2.3 ; R10.1 v1(87.5,29) ; R11.1 v1(87.5,31)
  Top Layer w0.5: J6.5 13.75,58.25 v1(16,58.25) ; J6.4 13.75,69.75 v1(16,69.75) ; v1(58.675,34.4) R4.2 ; v1(59.7,36.175) 59.7,36.475 ; v1(80.5,27.3) C2.1@80.9,27.3 ; v1(85.825,67.575) R17.1
  other v1: 58.75,21.25 59.5,21.25 60.25,21.25 61,21.25 61.75,21.25 62.5,21.25 63.25,21.25 58,22 58.75,22 59.5,22 60.25,22 61,22 61.75,22 62.5,22 63.25,22 64,22 58,22.75 58.75,22.75 59.5,22.75 60.25,22.75 61,22.75 61.75,22.75 62.5,22.75 63.25,22.75 64,22.75 58,23.5 58.75,23.5 59.5,23.5 60.25,23.5 61,23.5 61.75,23.5 62.5,23.5 63.25,23.5 64,23.5 58,24.25 58.75,24.25 59.5,24.25 60.25,24.25 61,24.25 61.75,24.25 62.5,24.25 63.25,24.25 64,24.25 58.75,25 59.5,25 60.25,25 61,25 61.75,25 62.5,25 63.25,25 64,25 58,25.75 58.75,25.75 59.5,25.75 60.25,25.75 61,25.75 61.75,25.75 62.5,25.75 63.25,25.75 64,25.75 58,26.5 58.75,26.5 59.5,26.5 60.25,26.5 61,26.5 61.75,26.5 62.5,26.5 63.25,26.5 64,26.5 58,27.25 58.75,27.25 59.5,27.25 60.25,27.25 61,27.25 61.75,27.25 62.5,27.25 63.25,27.25 64,27.25 58,28 58.75,28 59.5,28 60.25,28 61,28 61.75,28 62.5,28 63.25,28 64,28 76.1,28.5 76.6,28.5 77.1,28.5 58,28.75 58.75,28.75 59.5,28.75 60.25,28.75 61,28.75 61.75,28.75 62.5,28.75 63.25,28.75 64,28.75 58,29.5 58.75,29.5 59.5,29.5 60.25,29.5 61,29.5 61.75,29.5 62.5,29.5 63.25,29.5 64,29.5 58.75,30.25 59.5,30.25 60.25,30.25 61,30.25 61.75,30.25 62.5,30.25 63.25,30.25 76.1,31.5 76.6,31.5 77.1,31.5 53.8,41.475 53.8,41.975 53.8,42.475 53.8,42.975 42.5,45 43,45 43.5,45 42.5,45.5 43,45.5 43.5,45.5 31,46 31.5,46 42.5,46 43,46 43.5,46 31,46.5 31.5,46.5 42.5,46.5 43,46.5 43.5,46.5 31,47 31.5,47 42.5,47 43,47 43.5,47 31,47.5 31.5,47.5 42.5,47.5 43,47.5 43.5,47.5 42.5,48 43,48 43.5,48 42.5,48.5 43,48.5 43.5,48.5 42.5,49 43,49 43.5,49 84.75,71.25 84.75,71.75 84.75,72.25
NetC3_1: C3.1 R8.1 U3.6 | length 3.6
  Top Layer w0.5: U3.6 C3.1@82.885,78.475 ; C3.1@82.925,78.515 R8.1
NetC3_2: C3.2 R7.1 U3.7 | length 3.6
  Top Layer w0.5: R7.1 C3.2 81.59,77.014 81.615,76.989 U3.7
NetC4_1: C4.1 R9.1 U3.2 | length 4
  Top Layer w0.5: C4.1@81.615,69.165 U3.2 ; C4.1 81.675,68.985 R9.1
NetC4_2: C4.2 R6.1 U3.1 | length 4.8
  Top Layer w0.5: R6.1 79.235,69.075 79.31,69 C4.2 80.343,69.002 80.343,71.684 U3.1
NetC5_1: C5.1 R18.1
NetP1_5: P1.5 TP2.1 U2.8 | length 22.3
  Top Layer w0.3: U2.8 82.925,30.975 TP2.1
  Bottom Layer w0.3: TP2.1 85.448,33.498 85.448,49.868 P1.5
NetP1_6: P1.6 R16.2 | length 19.9
  Top Layer w0.5: P1.6 85.54,52.5 87.5,52.5 89,54 89,66.575 R16.2
NetP1_10: P1.10 TP1.1 U1.1 U1.2 | length 39.1
  Top Layer w0.3: U1.1 58.155,42.629 58.276,42.75 TP1.1
  Bottom Layer w0.3: v1(57.5,41.5) 75.5,41.5 82,48 82,55.184 82.834,56.018 83.978,56.018 P1.10
NetQ1_2: Q1.2 Q2.2 R18.2 XF1.1 XF1.2
NetR1_1: R1.1 R2.2 U1.5
NetR1_2: R1.2 U1.3 U1.7 | length 8.3
  Top Layer w0.5: R1.2 55.615,40.6 ; U1.3 55.615,40.6 ; U1.7 56.885,39.33 55.615,40.6
NetR3_2: R3.2 R4.1 U1.6
NetR10_2: R10.2 U2.6 | length 3.3
  Top Layer w0.3: U2.6@82.412,29.687 U2.6 84.775,29.675 85.325,29.125 R10.2
NetR11_2: R11.2 U2.7 | length 3.3
  Top Layer w0.3: U2.7 84.775,30.325 85.325,30.875 R11.2
Source1: J5.1 Q1.3 R9.2 R12.2 R13.2 | length 80.5
  Top Layer w0.5: 64,79 74.5,79 76.594,76.906 76.594,68.406 77.5,67.5 v1(79.25,67.5) R9.2
  Bottom Layer w0.2: v1(79.25,67.5) 77,69.75 77,79 74,82 74,106 75,107 84.5,107 J5.1
Source2: J4.1 Q2.3 R8.2 R14.2 R15.2 | length 70.4
  Top Layer w0.5: R14.2@41.911,85.661 45,88.75 69.75,88.75 v1(78.5,80) R8.2
  Bottom Layer w0.2: J4.1 76.5,82 v1(78.5,80)
pads on no net: J6.1

## Polygon pours and split planes (outlines as drawn)
GND on Int1 (GND) "s" (solid, pour order 3): 1,114 118,114 118,20 1,20
GND on Int2 (PWR) "NONET_L-01_P-001" (solid, pour order 4): 0,115 112,115 112,20 0,20
GND on Top Layer "NONET_L-01_P-001" (solid, pour order 37): 28.4,48.5 28.4,45 32,45 32,47.5 31,48.5
NetC5_1 on Top Layer "NONET_L-01_P-001" (solid, pour order 36): 28,41.75 22,41.75 22,48.5 28,48.5
NetQ1_2 on Top Layer "NONET_L-01_P-001" (solid, pour order 35): 30,28 30,41.25 22,41.25 22,28
"DUT Input" on Top Layer "NONET_L-01_P-001" (solid, pour order 33): 32,38 32,20 53,20 53,35 50,38
+4.096V on Top Layer "NONET_L-01_P-001" (solid, pour order 31): 80.5,75.3 79.6,75.3 cw(c79.6,75.5) 79.4,75.5 79.4,77.2 cw(c79.6,77.2) 79.6,77.4 80.5,77.4 cw(c80.5,77.2) 80.7,77.2 80.7,75.5 cw(c80.5,75.5)
GND on Top Layer "NONET_L-01_P-001" (solid, pour order 30): 84,72.7 84.9,72.7 cw(c84.9,72.5) 85.1,72.5 85.1,70.8 cw(c84.9,70.8) 84.9,70.6 84,70.6 cw(c84,70.8) 83.8,70.8 83.8,72.5 cw(c84,72.5)
+4.096V on Top Layer "NONET_L-01_P-001" (solid, pour order 29): 81.3,29.3 83.1,29.3 cw(c83.1,29.1) 83.3,29.1 83.3,27.841 cw(c82.959,27.841) 83.2,27.6 82.5,26.9 cw(c82.259,27.141) 82.259,26.8 81.7,26.8 cw(c81.7,26.9) 81.6,26.9 81.6,27.7 ccw(c81.359,27.7) 81.529,27.871 81.1,28.3 cw(c81.341,28.541) 81,28.541 81,29 cw(c81.3,29)
DUT_ISEN_P on Top Layer "NONET_L-01_P-001" (solid, remove dead copper, pour order 26): 28.5,108 91,108 99,100 99,33.5 76,33.5 75,32.5 75,31.5 74.5,31 67,31 65.5,32.5 65.5,43.5 87.5,43.5 90,46 90,71 85.5,75.5 85.5,79 83.5,81 78.75,81 70.25,89.5 28.5,89.5
Source2 on Top Layer "NONET_L-01_P-001" (solid, pour order 27): 28.5,87 36.5,87 43.25,87 43.25,78 28.5,78
Source1 on Top Layer "NONET_L-01_P-001" (solid, pour order 28): 49,87 64.25,87 64.25,78 49,78
GND on Top Layer "Top Layer-GND" (solid, pour order 20): 57,21 ccw(c57.5,21) 57.5,20.5 74.5,20.5 ccw(c74.5,21) 75,21 75,28.5 ccw(c74.5,28.5) 74.5,29 65.5,29 cw(c65.5,29.5) 65,29.5 65,30.5 ccw(c64.5,30.5) 64.5,31 57.5,31 ccw(c57.5,30.5) 57,30.5 57,29
GND on Top Layer "NONET_L-01_P-001" (solid, pour order 18): 77.3,30.7 75.9,30.7 cw(c75.9,30.9) 75.7,30.9 75.7,31.6 cw(c75.9,31.6) 75.9,31.8 77.3,31.8 cw(c77.3,31.6) 77.5,31.6 77.5,30.9 cw(c77.3,30.9)
GND on Top Layer "NONET_L-01_P-001" (solid, pour order 17): 75.9,29.3 77.3,29.3 cw(c77.3,29.1) 77.5,29.1 77.5,28.4 cw(c77.3,28.4) 77.3,28.2 75.9,28.2 cw(c75.9,28.4) 75.7,28.4 75.7,29.1 cw(c75.9,29.1)
NetR3_2 on Top Layer "NONET_L-01_P-001" (solid, pour order 12): 55.4,38.675 55.8,38.675 cw(c55.8,38.475) 56,38.475 56,36.325 ccw(c56.45,36.325) 56.45,35.875 57.6,35.875 cw(c57.6,35.675) 57.8,35.675 57.8,34.775 cw(c57.6,34.775) 57.6,34.575 56.783,34.575 cw(c56.783,35.016) 56.471,34.704 ccw(c56.059,34.292) 56.059,34.875 55.4,34.875 cw(c55.4,35.075) 55.2,35.075 55.2,38.475 cw(c55.4,38.475)
NetR1_1 on Top Layer "NONET_L-01_P-001" (solid, pour order 13): 52.1,39.675 54.4,39.675 cw(c54.4,39.275) 54.8,39.275 54.8,35.075 cw(c54.6,35.075) 54.6,34.875 53.9,34.875 cw(c53.9,35.075) 53.7,35.075 53.7,38.375 ccw(c53.3,38.375) 53.3,38.775 52.1,38.775 cw(c52.1,38.975) 51.9,38.975 51.9,39.475 cw(c52.1,39.475)
GND on Top Layer "NONET_L-01_P-001" (solid, pour order 14): 53.7,43.275 54.6,43.275 cw(c54.6,43.075) 54.8,43.075 54.8,41.375 cw(c54.6,41.375) 54.6,41.175 53.7,41.175 cw(c53.7,41.375) 53.5,41.375 53.5,43.075 cw(c53.7,43.075)
NetP1_10 on Top Layer "NONET_L-01_P-001" (solid, pour order 15): 56.4,43.075 56.4,41.375 ccw(c56.6,41.375) 56.6,41.175 58.4,41.175 ccw(c58.4,41.375) 58.6,41.375 58.6,43.075 ccw(c58.4,43.075) 58.4,43.275 56.6,43.275 ccw(c56.6,43.075)
no net on Top Overlay "NONET_L-01_P-001" (solid): 20.25,35.75 20.5,35.75 21.75,33.5 20.5,31.25 20.25,31.25
no net on Top Overlay "NONET_L-01_P-001" (solid): 30.75,23.75 30.75,23.5 36.25,21.75 41.75,23.5 41.75,23.75
+4.096V on Bottom Layer "NONET_L-01_P-001" (solid, pour order 38): 80.5,75.3 79.6,75.3 cw(c79.6,75.5) 79.4,75.5 79.4,77.2 cw(c79.6,77.2) 79.6,77.4 80.5,77.4 cw(c80.5,77.2) 80.7,77.2 80.7,75.5 cw(c80.5,75.5)
"DUT Input" on Bottom Layer "NONET_L-01_P-001" (solid, pour order 34): 32,38 32,20 53,20 53,35 50,38
NetQ1_2 on Bottom Layer "NONET_L-01_P-001" (solid, remove dead copper, pour order 32): 11.5,28 11.5,100.75 18.75,108 60.5,108 68.5,100 68.5,84 66.75,82.25 66.75,79.5 64.25,79.5 64.25,82.25 62.5,84 47.5,84 45.75,82.25 45.75,79.5 43.25,79.5 43.25,82.25 41.5,84 32,84 30,82 30,28
+4.096V on Bottom Layer "NONET_L-01_P-001" (solid, pour order 21): 83.5,47.5 85,47.5 ccw(c85,48) 85.5,48 85.5,49.25 cw(c86,49.25) 86,49.75 89.25,49.75 ccw(c89.25,50.25) 89.75,50.25 89.75,62 ccw(c89.25,62) 89.25,62.5 86,62.5 ccw(c86,62) 85.5,62 85.5,60.5 ccw(c86,60.5) 86,60 87.5,60 cw(c87.5,59.5) 88,59.5 88,55.5 cw(c87.5,55.5) 87.5,55 83.5,55 ccw(c83.5,54.5) 83,54.5 83,48 ccw(c83.5,48)
no net on Top Solder "NONET_L-01_P-001" (solid): 52.5,87 64.25,87 64.25,79.5 52.5,79.5
no net on Top Solder "NONET_L-01_P-001" (solid): 31.5,87 43.25,87 43.25,79.5 31.5,79.5
no net on Top Solder "NONET_L-01_P-001" (solid): 31,89.5 43,89.5 43,92.5 44,93.5 51,93.5 52,92.5 52,89.5 64,89.5 64,92.5 65,93.5 86.5,93.5 cw(c86.5,88.5) 91.5,88.5 91.5,43.5 cw(c89.5,43.5) 89.5,41.5 74.5,41.5 ccw(c74.5,35.5) 68.5,35.5 68.5,31 74,31 74,35 cw(c75.5,35) 75.5,36.5 90.5,36.5 ccw(c90.5,43) 97,43 97,90 ccw(c87.5,90) 87.5,99.5 32,99.5 31,98.5
"DUT Input" on Bottom Solder "NONET_L-01_P-001" (solid, pour order 39): 32.5,37.5 32.5,20.5 52.75,20.5 52.75,34.5 49.75,37.5
no net on Bottom Solder "NONET_L-01_P-001" (solid): 64.4,79.5 66.6,79.5 66.6,87.5 64.4,87.5
no net on Bottom Solder "NONET_L-01_P-001" (solid): 43.4,79.5 45.6,79.5 45.6,87.5 43.4,87.5

## Keep-outs
Top Layer:
  circle w0.254: c66.5,105 r1.5
  circle w0.254: c71.5,105 r1.5
  circle w0.254: c76.5,105 r1.5
  circle w0.254: c81.5,105 r1.5
  circle w0.254: c86.5,105 r1.5
  circle w0.254: c15,24 r3.808
  circle w0.254: c24,24 r3.808
  circle w0.254: c95,24 r3.808
  circle w0.254: c86,24 r3.808
  circle w0.254: c95,104 r3.808
  circle w0.254: c86,86 r3.808
  circle w0.254: c24,86 r3.808
  circle w0.254: c15,104 r3.808
Int1 (GND):
  rectangle: 45.5,20 52.5,30.75
  rectangle: 24.5,30 40.5,37
  rectangle: 39,78 71,83
Int2 (PWR):
  rectangle: 45.5,20 52.5,30.75
  rectangle: 24.5,30 40.5,37
  rectangle: 39,78 71,83
Bottom Layer:
  circle w0.254: c15,104 r3.808
  circle w0.254: c24,86 r3.808

## Silkscreen, mask and mechanical layers (free items; w line width, h text height)
Top Overlay:
  circle w0.254: c24,86 r3.202
  circle w0.254: c86,86 r3.202
  circle w0.254: c86,24 r3.202
  circle w0.254: c24,24 r3.202
  circle w0.254: c61,32.5 r1
  circle w0.254: c48.75,32.5 r1
  circle w0.254: c49.25,45.75 r1
  circle w0.254: c40.25,45.75 r1
  lines w0.2: 14.5,92 25.4,92 25.4,97 14.5,97 14.5,92
  lines w0.254: 27.25,24 28,24 ; 27.25,86 28,86 ; 28,22.5 28,25.5 ; 28,84.5 28,87.5 ; 28.5,23 28.5,25 ; 28.5,85 28.5,87 ; 29,23.5 29,24.5 ; 29,85.5 29,86.5 ; 39.75,45.75 40.75,45.75 ; 48.25,32.5 49.25,32.5 ; 48.75,32 48.75,33 ; 48.75,45.75 49.75,45.75 ; 49.25,45.25 49.25,46.25 ; 60.5,32.5 61.5,32.5 ; 81,23.5 81,24.5 ; 81,85.5 81,86.5 ; 81.5,23 81.5,25 ; 81.5,85 81.5,87 ; 82,22.5 82,25.5 ; 82,24 82.75,24 ; 82,84.5 82,87.5 ; 82,86 82.75,86
  text "Gate Q1" at 64.555,102.148 h1.2
  text "Gate Q2" at 69.494,102.148 h1.2
  text "Src Q2" at 74.816,102.148 h1.2
  text "Src Q1" at 84.876,102.148 h1.2
  text "Vset" at 80.372,102.122 h1.2
  text "EUT: 30V, 10A" at 20.791,101.033 h5
  text "Power Board / WK / Nov 2024" at 14.5,92.139 h1.7
  text "FAN" at 12,71.717 h2.5
  text "Vset" at 86.122,70.122 h1.2
  text "HEATSINK / REQUIRED" at 34.389,57.234 h2.5 r90
  text "* Pins Face Up" at 80.797,44.675 h1.2 r90
  text "TO CONTROLLER" at 82.965,44.675 h2 r90
  text "Vsen" at 60.753,42.372 h1.2
  text "TEMP" at 40.75,40.217 h2.5
  text "JLCJLCJLCJLC" at 27.504,33.004 h0.85
  text "Isen" at 85.248,31.872 h1.2
  text "10A FUSE" at 15,31.25 h2
  text "TO EUT" at 30.75,23.5 h2.5
Bottom Overlay:
  circle w0.254: c24,24 r3.202
  circle w0.254: c86,24 r3.202
  circle w0.254: c86,86 r3.202
  circle w0.254: c24,86 r3.202
  lines w0.1: 77.4,47.8 80,47.8 80,49.6 77.4,49.6 77.4,47.8 ; 77.4,50.34 80,50.34 80,52.14 77.4,52.14 77.4,50.34 ; 77.4,55.42 80,55.42 80,57.22 77.4,57.22 77.4,55.42 ; 77.4,60.5 80,60.5 80,62.3 77.4,62.3 77.4,60.5 ; 77.4,63.1 80,63.1 80,64.9 77.4,64.9 77.4,63.1 ; 80.3,47.8 82.9,47.8 82.9,49.6 80.3,49.6 80.3,47.8 ; 80.3,50.34 82.9,50.34 82.9,52.14 80.3,52.14 80.3,50.34 ; 80.3,55.42 82.9,55.42 82.9,57.22 80.3,57.22 80.3,55.42 ; 80.3,60.5 82.9,60.5 82.9,62.3 80.3,62.3 80.3,60.5
  lines w0.254: 15,36.5 15,27 16.5,28 ; 15,91.5 15,101 16.5,100 ; 27.25,24 28,24 ; 27.25,86 28,86 ; 28,22.5 28,25.5 ; 28,84.5 28,87.5 ; 28.5,23 28.5,25 ; 28.5,85 28.5,87 ; 29,23.5 29,24.5 ; 29,85.5 29,86.5 ; 81,23.5 81,24.5 ; 81,85.5 81,86.5 ; 81.5,23 81.5,25 ; 81.5,85 81.5,87 ; 82,22.5 82,25.5 ; 82,24 82.75,24 ; 82,84.5 82,87.5 ; 82,86 82.75,86 ; 95,36.5 95,27 96.5,28 ; 95,91.5 95,101 96.5,100
  text "SPACER" at 15.359,91.806 h2 r270
  text "SPACER" at 95.359,91.806 h2 r270
  text "INSULATE !" at 50.596,89.699 h2.5
  text "INSULATE !" at 71.596,89.699 h2.5
  text "4V" at 79.985,63.095 h1
  text "GND" at 82.885,63.035 h1
  text "4V" at 82.885,60.495 h1
  text "FAN" at 80.015,60.485 h1
  text "GND" at 82.885,57.955 h1
  text "GND" at 80.015,57.945 h1
  text "HEATSINK / REQUIRED" at 28.611,57.234 h2.5 r270
  text "Tmp" at 82.885,55.415 h1
  text "Vsen" at 80.036,55.405 h1
  text "GND" at 82.885,52.875 h1
  text "GND" at 80.015,52.865 h1
  text "Isen" at 82.885,50.335 h1
  text "DAC" at 80.015,50.325 h1
  text "INSULATE !" at 90.699,48.904 h2.5 r270
  text "3V3" at 82.885,47.795 h1
  text "4V" at 80.015,47.785 h1
  text "GND" at 82.885,45.255 h1
  text "GND" at 80.015,45.245 h1
  text "INSULATE !" at 38.596,39.199 h2.5
  text "SPACER" at 15.359,28.806 h2 r270
  text "SPACER" at 95.359,28.806 h2 r270
Mechanical 1:
  circle w0.1: c15,104 r1.7
  circle w0.1: c95,104 r1.7
  circle w0.1: c95,24 r1.7
  circle w0.1: c15,24 r1.7